# Altium PCB Custom_Keyboard.PcbDoc (part 1 of 4)
Units mil, origin at the board's own origin, x right, y up, seen from the top; angles counter-clockwise.
Board outline 4767 x 2153 mil, 2 copper layers (Top Layer, Bottom Layer), stack 57 mil thick; 298 components, 247 nets, 1117 pads, 576 vias.
Unrouted connection lines stored in the file: 2.
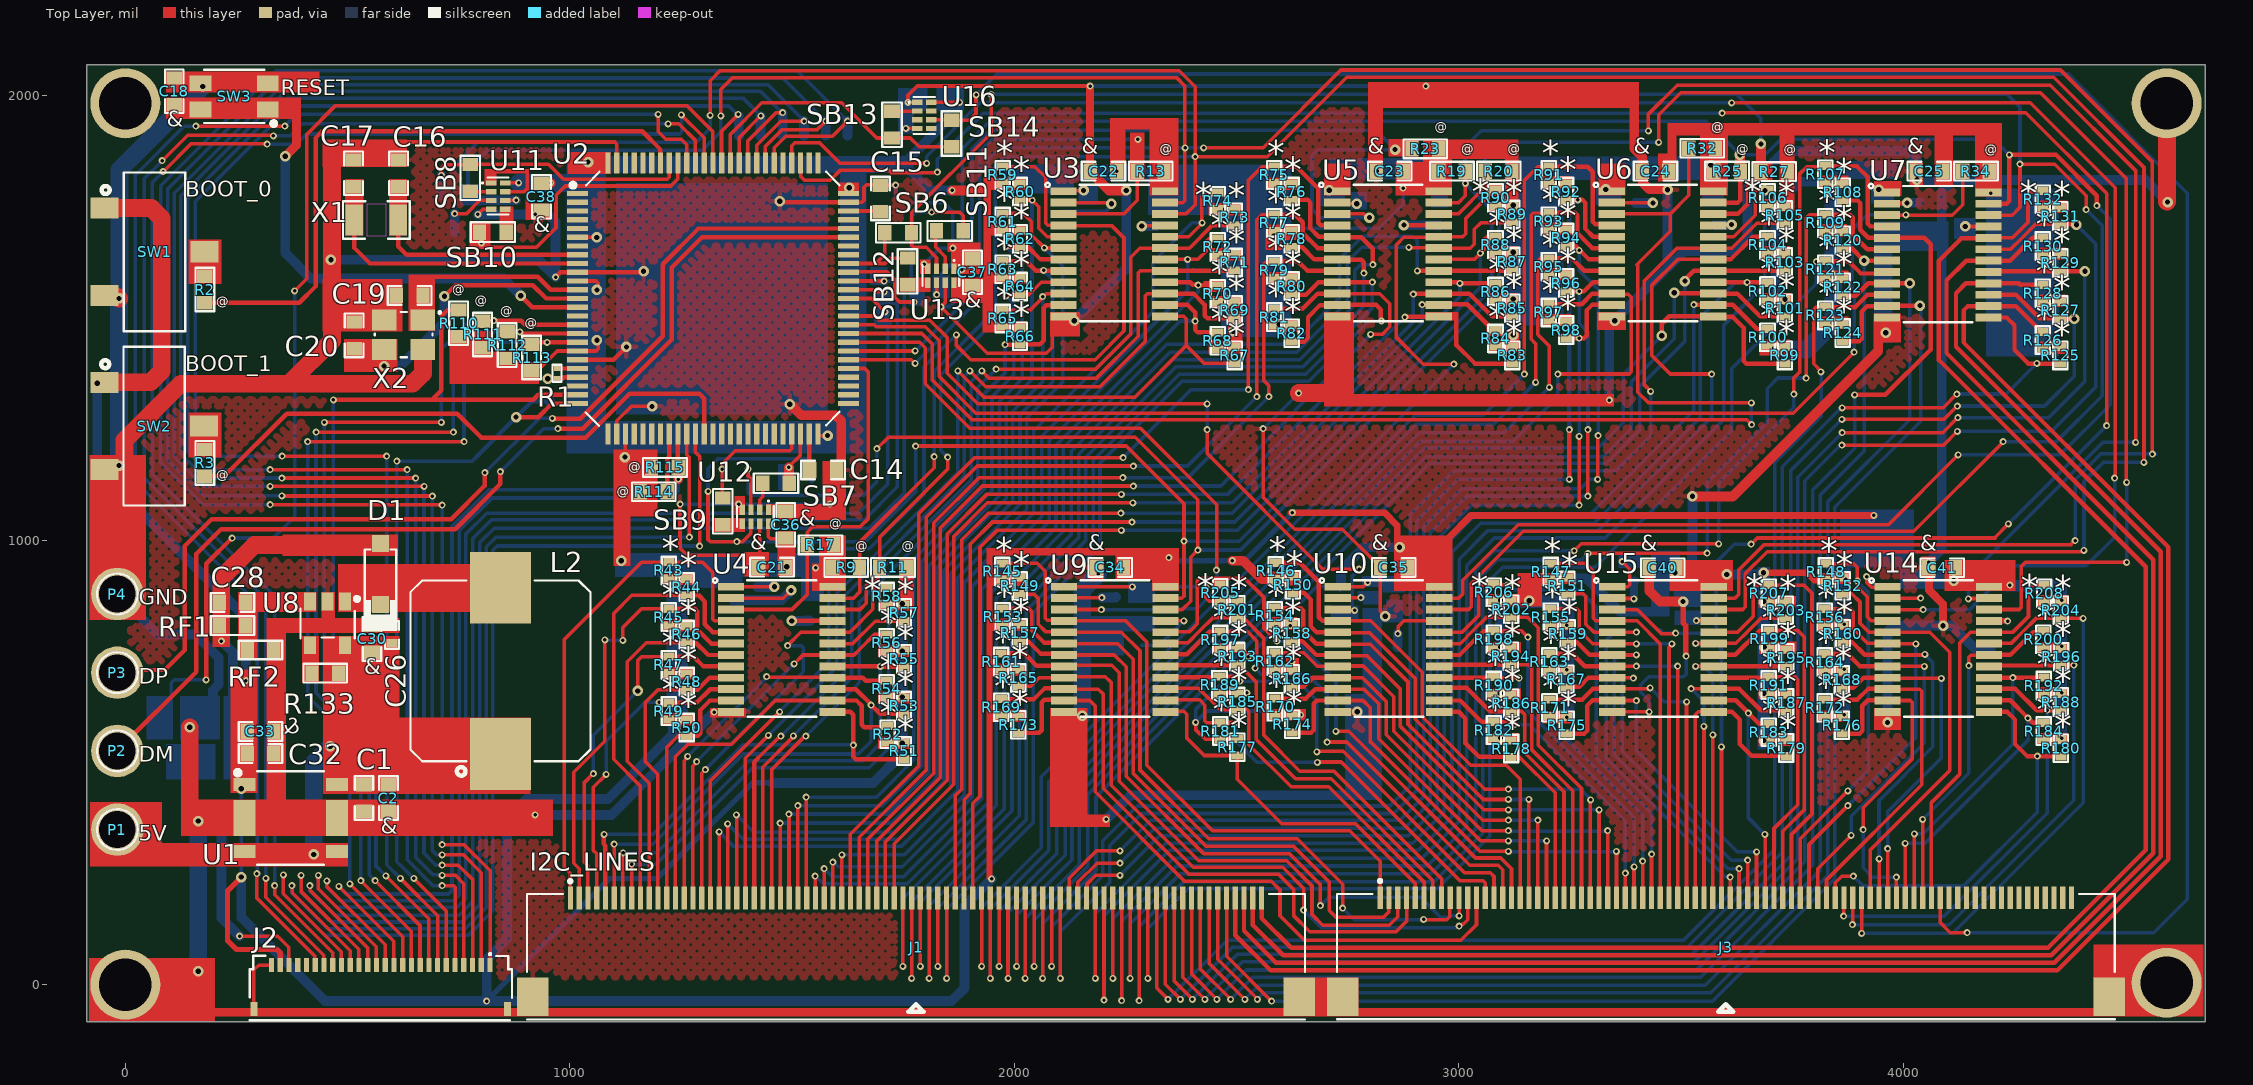
[diagram p0: Top Layer view]
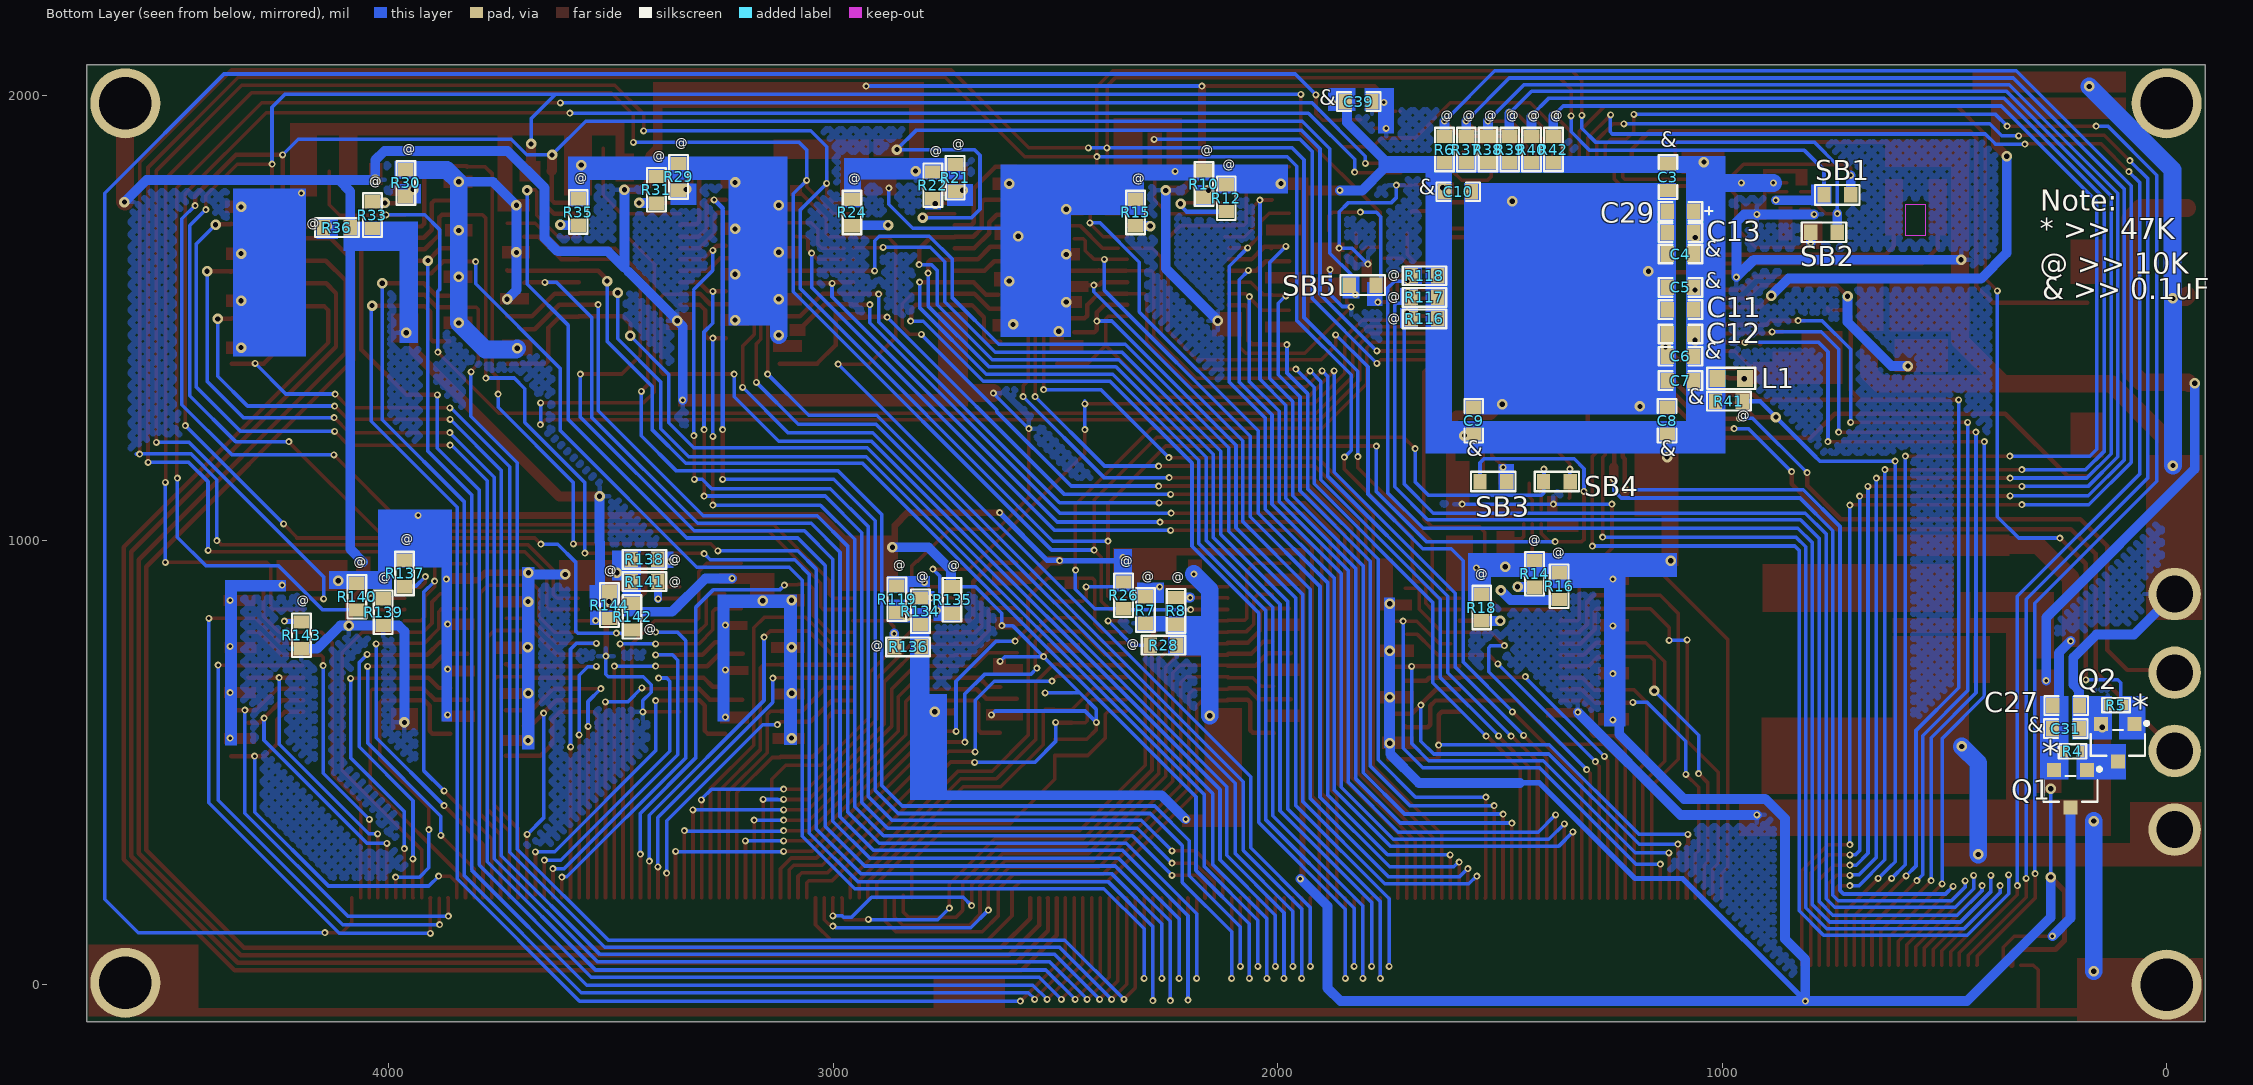
[diagram p1: Bottom Layer view, seen from below]
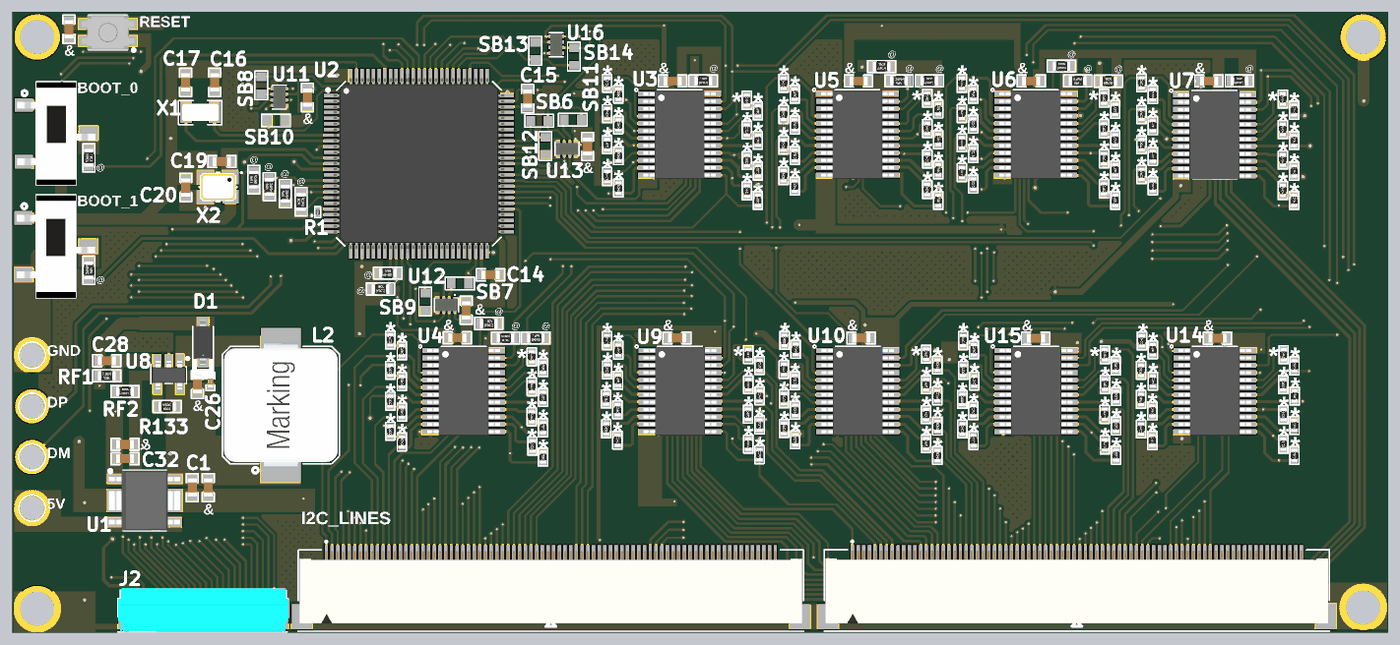
[diagram p4: 3D render of the assembled board from above, using the file's embedded part models]
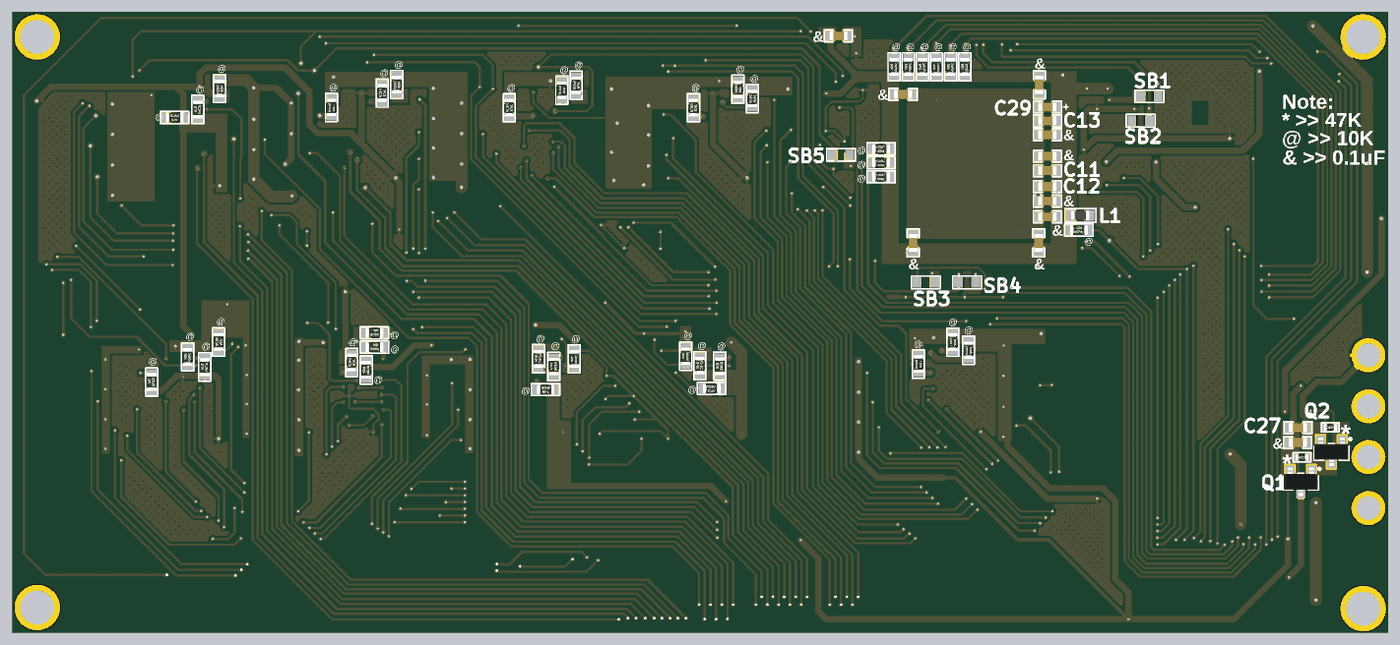
[diagram p5: 3D render of the assembled board from below, using the file's embedded part models]

## Layer stack, top to bottom
Top Solder: solder mask 3, Solder Resist, Dk 3.5
Top Layer: signal copper 10
Dielectric 1: dielectric 37, FR-4, Dk 4.8
Bottom Layer: signal copper 10
Bottom Solder: solder mask 3, Solder Resist, Dk 3.5

## Board outline
-87,-83 -87,2070 4680,2070 4680,-83

## Design rules (kind name [scope] priority, off if disabled: settings)
Clearance [All] p1: gap=7 ignorepadtopadclearanceinfootprint=FALSE except(0: Arc-Hole Track-Hole SMDPad-Hole THPad-Hole Via-Hole Fill-Hole Poly-Hole Region-Hole Text-Hole; 3: Arc-SMDPad Track-SMDPad SMDPad-SMDPad)
HoleSize [All] p1: absolutevalues=TRUE maxlimit=1000 minlimit=1 maxpercent=80.000 minpercent=20.000
HoleToHoleClearance [All] p1: gap=0 allowstackedmicrovias=TRUE
MinimumSolderMaskSliver [All] p1: minsoldermaskwidth=0
PolygonConnect [All] p1: connectstyle=Relief reliefconductorwidth=10 reliefentries=4 polygonreliefangle="90 Angle" airgapwidth=10
RoutingVias [All] p1: holewidth=11.81 width=23.62 viastyle="Through Hole" minholewidth=7.87 minwidth=15.75 maxholewidth=11.81 maxwidth=23.62
SilkToSilkClearance [All] p1: silktosilkclearance=0
SilkToSolderMaskClearance [IsPad] p1: minsilkscreentomaskgap=0 clearancetoexposedcopper=TRUE
SolderMaskExpansion [All] p1: expansion=4 istentingtop=FALSE
Width [All] p1: maxlimit=40 minlimit=8 preferedwidth=22
25 further rules are at their usual default settings.

## Classes and differential pairs
component class U_Rpull_Section2: R145 R146 R147 R148 R149 R150 R151 R152 R153 R154 R155 R156 R157 R158 R159 R160 R161 R162 R163 R164 R165 R166 R167 R168 R169 R170 R171 R172 R173 R174 R175 R176 R177 R178 R179 R180 R181 R182 R183 R184 R185 R186 R187 R188 R189 R190 R191 R192 R193 R194 R195 R196 R197 R198 R199 R200 R201 R202 R203 R204 R205 R206 R207 R208
component class "U_Mux_Sheet _3": C40 C41 R137 R138 R139 R140 R141 R142 R143 R144 U14 U15
component class U_Connector_Sheet_2: J3
component class U_BufferIC_Section: C36 C37 C38 C39 SB1 SB2 SB3 SB4 SB5 SB6 SB7 SB8 SB9 SB10 SB11 SB12 SB13 SB14 U11 U12 U13 U16
component class U_RPull_Section: R43 R44 R45 R46 R47 R48 R49 R50 R51 R52 R53 R54 R55 R56 R57 R58 R59 R60 R61 R62 R63 R64 R65 R66 R67 R68 R69 R70 R71 R72 R73 R74 R75 R76 R77 R78 R79 R80 R81 R82 R83 R84 R85 R86 R87 R88 R89 R90 R91 R92 R93 R94 R95 R96 R97 R98 R99 R100 R101 R102 R103 R104 R105 R106 R107 R108 R109 R120 R121 R122 R123 R124 R125 R126 R127 R128 R129 R130 R131 R132
component class U_Power_Section: C1 C2 C26 C27 C28 C30 C31 C32 C33 D1 L2 Q1 Q2 R4 R5 R133 RF1 RF2 U1 U8
component class U_Mux_Sheet_2: C24 C25 C35 R25 R27 R29 R30 R31 R32 R33 R34 R35 R36 R119 R134 R135 R136 U6 U7 U10
component class U_Mux_Sheet_1: C21 C22 C23 C34 R7 R8 R9 R10 R11 R12 R13 R14 R15 R16 R17 R18 R19 R20 R21 R22 R23 R24 R26 R28 U3 U4 U5 U9
component class U_Controller_Section_2: R6 R37 R38 R39 R40 R41 R42 R110 R111 R112 R113 R114 R115 R116 R117 R118
component class U_Controller_Section_1: C3 C4 C5 C6 C7 C8 C9 C10 C11 C12 C13 C14 C15 C16 C17 C18 C19 C20 C29 L1 R1 R2 R3 SW1 SW2 SW3 U2 X1 X2
component class U_Connector_Sheet: J1 J2 P1 P2 P3 P4

## Components (designator, comment, footprint, x,y, rotation, side; value= is the part's Value field where it differs from the comment)
C1 "4.7UF" Cap0603#1 537,420 r270 top locked
C2 "0.1uF" Cap0603#1 592,420 r270 top locked
C3 "0.1uF" Cap0603#1 1122,1817 r270 bottom
C4 "0.1uF" Cap0603#1 1094,1644 r0 bottom locked
C5 "0.1uF" Cap0603#1 1094,1569 r0 bottom locked
C6 "0.1uF" Cap0603#1 1094,1414 r0 bottom locked
C7 "0.1uF" Cap0603#1 1094,1359 r0 bottom locked
C8 "0.1uF" Cap0603#1 1124,1269 r90 bottom locked
C9 "0.1uF" Cap0603#1 1559,1269 r90 bottom locked
C10 "0.1uF" Cap0603#1 1594,1784 r180 bottom locked
C11 "1uF" Cap0603#1 1094,1519 r0 bottom locked
C12 "1uF" Cap0603#1 1094,1464 r0 bottom locked
C13 "4.7UF" Cap0603#1 1094,1692 r0 bottom
C14 "2.2uF" Cap0603#1 1570,1158 r0 top locked
C15 "2.2uF" Cap0603#1 1699,1769 r90 top locked
C16 "10pF" Cap0603#1 614.71,1825.5 r270 top
C17 "10pF" Cap0603#1 513.71,1825.5 r270 top
C18 "0.1uF" Cap0603#1 110,2010 r90 top locked
C19 "10pF" Cap0603#1 639.61,1550.93 r0 top
C20 "10pF" Cap0603#1 514.61,1460.93 r270 top
C21 "0.1uF" Cap0603#1 1455,939.5 r180 top locked
C22 "0.1uF" Cap0603#2 2201,1830.5 r180 top
C23 "0.1uF" Cap0603#2 2845,1830.5 r180 top locked
C24 "0.1uF" Cap0603#2 3443,1830.5 r180 top locked
C25 "0.1uF" Cap0603#1 4059,1830.5 r180 top
C26 "2.2uF" "Cap 0402" 600,787 r90 top locked
C27 "10uF" Cap0603#1 226,628 r180 bottom
C28 "220pF" Cap0603#1 241,860 r180 top locked
C29 "1uF" F981E105MMA 1094,1740 r0 bottom
C30 "0.1uF" Cap0603#1 555,778 r90 top locked
C31 "0.1uF" Cap0603#1 227,576 r180 bottom
C32 "4.7UF" Cap0603#1 304,520 r0 top locked
C33 "0.1uF" Cap0603#1 304,570 r0 top locked
C34 "0.1uF" Cap0603#1 2216,939 r180 top
C35 "0.1uF" Cap0603#1 2854,939 r180 top
C36 "0.1uF" Cap0603#1 1486,1035 r90 top
C37 "0.1uF" Cap0603#1 1906,1603 r90 top
C38 "0.1uF" Cap0603#1 936,1773 r270 top
C39 "0.1uF" Cap0603#1 1818,1987 r180 bottom
C40 "0.1uF" Cap0603#1 3459,938 r180 top
C41 "0.1uF" Cap0603#1 4088,938 r180 top
D1 "MBR0520" SOD-123 574,924 r90 top
J1 "046288080000846+" 046288080000846+ 1779,83.78 r0 top locked
J2 "FH34SRJ-26S-0.5SH(50)" FH34SRJ-26S-0.5SH(50) 574.7,-5.21 r0 top locked
J3 "046288080000846+" 046288080000846+ 3601.2,84.22 r0 top locked
L1 "FBMH1608HL121-TV" "IND 0603" 979.91,1364 r180 bottom locked
L2 "3.3UH" 74437368033 844,706 r90 top locked
P1 "" "TEST POINT" -18,349 r270 top
P2 "" "TEST POINT" -18,526 r270 top
P3 "" "TEST POINT" -18,702 r270 top
P4 "" "TEST POINT" -18,879 r270 top
Q1 "FDN338P" SOT23-3 216.41,440.68 r0 bottom
Q2 "FDN335N" SOT23-3 110,544 r0 bottom
R1 "0R" Res-0201 971.39,1375.57 r270 top locked
R2 "10K" Res0603 179,1564 r90 top locked
R3 "10K" Res0603 179,1174 r90 top locked
R4 "47K" Res0402#1 212,525 r180 bottom
R5 "47K" Res0402#1 114,629 r180 bottom
R6 "10K" Res0603 1625,1879 r270 bottom locked
R7 "10K" Res0603 2298,843 r270 bottom
R8 "10K" Res0603 2229,841 r270 bottom
R9 "10K" Res0603 1622,939 r0 top locked
R10 "10K" Res0603 2166,1801.5 r90 bottom locked
R11 "10K" Res0603 1727,939 r180 top locked
R12 "10K" Res0603 2116,1769.5 r90 bottom locked
R13 "10K" Res0603 2307,1830.5 r180 top
R14 "10K" Res0603 1422,924.5 r90 bottom locked
R15 "10K" Res0603 2320,1737.5 r90 bottom locked
R16 "10K" Res0603 1367,896.5 r90 bottom locked
R17 "10K" Res0603 1564,989.5 r180 top
R18 "10K" Res0603 1541,848.5 r90 bottom locked
R19 "10K" Res0603 2985,1830.5 r0 top locked
R20 "10K" Res0603 3090,1830.5 r180 top locked
R21 "10K" Res0603 2726,1815.5 r90 bottom locked
R22 "10K" Res0603 2776,1798.5 r90 bottom locked
R23 "10K" Res0603 2925,1880.5 r180 top locked
R24 "10K" Res0603 2958,1737.5 r90 bottom locked
R25 "10K" Res0603 3604,1830.5 r0 top locked
R26 "10K" Res0603 2347,876 r270 bottom
R27 "10K" Res0603 3710,1829.5 r180 top locked
R28 "10K" Res0603 2257,764 r180 bottom
R29 "10K" Res0603 3348,1817.5 r90 bottom locked
R30 "10K" Res0603 3961.65,1803.93 r90 bottom locked
R31 "10K" Res0603 3398,1788.5 r90 bottom locked
R32 "10K" Res0603 3548,1882 r180 top locked
R33 "10K" Res0603 4037.08,1731.5 r270 bottom
R34 "10K" Res0603 4164,1830.5 r180 top
R35 "10K" Res0603 3574,1738.5 r90 bottom locked
R36 "10K" Res0603 4117,1703.5 r180 bottom
R37 "10K" Res0603 1576,1879 r270 bottom locked
R38 "10K" Res0603 1527,1879 r270 bottom locked
R39 "10K" Res0603 1478,1879 r270 bottom locked
R40 "10K" Res0603 1429,1879 r270 bottom locked
R41 "10K" Res0603 985,1313 r0 bottom
R42 "10K" Res0603 1380,1879 r270 bottom locked
R43 "47K" Res0402#1 1223,932 r270 top locked
R44 "47K" Res0402#1 1263,894.5 r90 top locked
R45 "47K" Res0402#1 1223,827 r270 top locked
R46 "47K" Res0402#1 1263,788 r90 top locked
R47 "47K" Res0402#1 1223,719.5 r270 top locked
R48 "47K" Res0402#1 1263,682 r90 top locked
R49 "47K" Res0402#1 1223,615.5 r270 top locked
R50 "47K" Res0402#1 1263,578.5 r90 top locked
R51 "47K" Res0402#1 1752,525.93 r90 top locked
R52 "47K" Res0402#1 1715,563.5 r270 top locked
R53 "47K" Res0402#1 1752,628 r90 top locked
R54 "47K" Res0402#1 1713,665.5 r270 top locked
R55 "47K" Res0402#1 1752,733 r90 top locked
R56 "47K" Res0402#1 1713,769.5 r270 top locked
R57 "47K" Res0402#1 1752,836.5 r90 top locked
R58 "47K" Res0402#1 1713,873.5 r270 top locked
R59 "47K" Res0402#2 1974,1822 r270 top locked
R60 "47K" Res0402#2 2013,1784.5 r90 top locked
R61 "47K" Res0402#3 1974,1717 r270 top locked
R62 "47K" Res0402#1 2013,1678 r90 top locked
R63 "47K" Res0402#1 1974,1609.5 r270 top locked
R64 "47K" Res0402#2 2013,1571 r90 top locked
R65 "47K" Res0402#2 1974,1499 r270 top locked
R66 "47K" Res0402#2 2013,1459 r90 top locked
R67 "47K" Res0402#1 2496,1415.93 r90 top locked
R68 "47K" Res0402#2 2458,1449 r270 top locked
R69 "47K" Res0402#2 2496,1518 r90 top locked
R70 "47K" Res0402#2 2458,1554.5 r270 top locked
R71 "47K" Res0402#2 2496,1625 r90 top locked
R72 "47K" Res0402#2 2458,1660 r270 top locked
R73 "47K" Res0402#2 2496,1726.5 r90 top locked
R74 "47K" Res0402#2 2458,1763.5 r270 top locked
R75 "47K" Res0402#2 2585,1822 r270 top locked
R76 "47K" Res0402#2 2624,1784.5 r90 top locked
R77 "47K" Res0402#2 2585,1714 r270 top locked
R78 "47K" Res0402#2 2624,1678 r90 top locked
R79 "47K" Res0402#2 2585,1608 r270 top locked
R80 "47K" Res0402#2 2624,1572 r90 top locked
R81 "47K" Res0402#2 2585,1502 r270 top locked
R82 "47K" Res0402#1 2624,1465.5 r90 top locked
R83 "47K" Res0402#1 3121,1415.93 r90 top locked
R84 "47K" Res0402#2 3083,1454 r270 top locked
R85 "47K" Res0402#2 3121,1522 r90 top locked
R86 "47K" Res0402#2 3083,1559.5 r270 top locked
R87 "47K" Res0402#2 3121,1627 r90 top locked
R88 "47K" Res0402#2 3083,1665 r270 top locked
R89 "47K" Res0402#2 3121,1733 r90 top locked
R90 "47K" Res0402#2 3083,1770.5 r270 top locked
R91 "47K" Res0402#2 3203,1822 r270 top locked
R92 "47K" Res0402#2 3242,1784.5 r90 top locked
R93 "47K" Res0402#2 3203,1717.5 r270 top locked
R94 "47K" Res0402#2 3242,1681 r90 top locked
R95 "47K" Res0402#2 3203,1615.5 r270 top locked
R96 "47K" Res0402#2 3242,1578.5 r90 top locked
R97 "47K" Res0402#2 3203,1512.5 r270 top locked
R98 "47K" Res0402#2 3242,1473 r90 top locked
R99 "47K" Res0402#2 3734,1415.93 r90 top locked
R100 "47K" Res0402#2 3695,1456.5 r270 top locked
R101 "47K" Res0402#2 3734,1522 r90 top locked
R102 "47K" Res0402#2 3695,1560.5 r270 top locked
R103 "47K" Res0402#2 3734,1626 r90 top locked
R104 "47K" Res0402#2 3695,1664.5 r270 top locked
R105 "47K" Res0402#2 3734,1731.5 r90 top locked
R106 "47K" Res0402#2 3695,1770.5 r270 top locked
R107 "47K" Res0402#1 3825,1823.43 r270 top locked
R108 "47K" Res0402#1 3864,1782.93 r90 top locked
R109 "47K" Res0402#1 3825,1714 r270 top locked
R110 "10K" Res0603 750,1488 r270 top locked
R111 "10K" Res0603 804,1463 r270 top locked
R112 "10K" Res0603 859,1439 r270 top locked
R113 "10K" Res0603 914,1411 r270 top locked
R114 "10K" Res0603 1189,1109 r180 top locked
R115 "10K" Res0603 1214,1164 r180 top locked
R116 "10K" Res0603 1670,1498 r180 bottom
R117 "10K" Res0603 1670,1546.5 r180 bottom
R118 "10K" Res0603 1670,1595 r180 bottom
R119 "10K" Res0603 2857,867 r270 bottom
R120 "47K" Res0402#1 3864,1675 r90 top locked
R121 "47K" Res0402#1 3825,1609.5 r270 top locked
R122 "47K" Res0402#1 3864,1569 r90 top locked
R123 "47K" Res0402#1 3825,1505.93 r270 top locked
R124 "47K" Res0402#1 3864,1466.43 r90 top locked
R125 "47K" Res0402#1 4353.65,1415.93 r90 top locked
R126 "47K" Res0402#1 4314.65,1450.43 r270 top locked
R127 "47K" Res0402#1 4353.65,1517.93 r90 top locked
R128 "47K" Res0402#1 4314.65,1555.93 r270 top locked
R129 "47K" Res0402#1 4353.65,1623.93 r90 top locked
R130 "47K" Res0402#1 4314.65,1661.93 r270 top locked
R131 "47K" Res0402#1 4353.65,1729.43 r90 top locked
R132 "47K" Res0402#1 4314.65,1767.43 r270 top locked
R133 "51K" Res0603 450,701 r0 top locked
R134 "10K" Res0603 2804,840 r270 bottom
R135 "10K" Res0603 2733,866 r270 bottom
R136 "10K" Res0603 2832,760 r180 bottom
R137 "10K" Res0603 3964.83,925.25 r90 bottom
R138 "10K" Res0603 3425,957 r0 bottom
R139 "10K" Res0603 4013,838 r270 bottom
R140 "10K" Res0603 4072,873 r270 bottom
R141 "10K" Res0603 3425,907 r0 bottom
R142 "10K" Res0603 3453,828 r270 bottom
R143 "10K" Res0603 4197,786 r270 bottom
R144 "10K" Res0603 3504,854 r90 bottom
R145 "47K" Res0402#1 1973.59,929.63 r270 top
R146 "47K" Res0402#1 2588.41,930.77 r270 top
R147 "47K" Res0402#1 3207.07,929.59 r270 top
R148 "47K" Res0402#1 3826.42,928.57 r270 top
R149 "47K" Res0402#1 2012.52,897.07 r90 top
R150 "47K" Res0402#1 2627,900 r90 top
R151 "47K" Res0402#1 3244.65,897.82 r90 top
R152 "47K" Res0402#1 3863.83,897.8 r90 top
R153 "47K" Res0402#1 1974,828 r270 top
R154 "47K" Res0402#1 2586,830 r270 top
R155 "47K" Res0402#1 3207.25,826.84 r270 top
R156 "47K" Res0402#1 3823.42,826.82 r270 top
R157 "47K" Res0402#1 2012,792 r90 top
R158 "47K" Res0402#1 2624,791 r90 top
R159 "47K" Res0402#1 3245.31,789.39 r90 top
R160 "47K" Res0402#1 3864.48,789.37 r90 top
R161 "47K" Res0402#1 1970.52,727.07 r270 top
R162 "47K" Res0402#1 2586.35,728.2 r270 top
R163 "47K" Res0402#1 3204,726.02 r270 top
R164 "47K" Res0402#1 3823.42,726 r270 top
R165 "47K" Res0402#1 2009.52,690.07 r90 top
R166 "47K" Res0402#1 2624.59,688.2 r90 top
R167 "47K" Res0402#1 3242.25,687.02 r90 top
R168 "47K" Res0402#1 3862.42,686 r90 top
R169 "47K" Res0402#1 1971,624 r270 top
R170 "47K" Res0402#1 2586.83,625.2 r270 top
R171 "47K" Res0402#1 3204.48,623.02 r270 top
R172 "47K" Res0402#1 3823.42,623 r270 top
R173 "47K" Res0402#1 2009.52,584.57 r90 top
R174 "47K" Res0402#1 2625.35,585.7 r90 top
R175 "47K" Res0402#1 3243,583.52 r90 top
R176 "47K" Res0402#1 3862.17,583.5 r90 top
R177 "47K" Res0402#1 2502.17,534.07 r90 top
R178 "47K" Res0402#1 3118,531.2 r90 top
R179 "47K" Res0402#1 3737,532.5 r90 top
R180 "47K" Res0402#1 4354.83,532 r90 top
R181 "47K" Res0402#1 2463.17,570.57 r270 top
R182 "47K" Res0402#1 3079,572.7 r270 top
R183 "47K" Res0402#1 3698,568 r270 top
R184 "47K" Res0402#1 4316.33,570.5 r270 top
R185 "47K" Res0402#1 2502.17,637.07 r90 top
R186 "47K" Res0402#1 3118,633.2 r90 top
R187 "47K" Res0402#1 3736.65,634.02 r90 top
R188 "47K" Res0402#1 4354.83,636 r90 top
R189 "47K" Res0402#1 2462,675 r270 top
R190 "47K" Res0402#1 3078.83,673.2 r270 top
R191 "47K" Res0402#1 3697.48,674.02 r270 top
R192 "47K" Res0402#1 4316.65,673 r270 top
R193 "47K" Res0402#1 2502,738.5 r90 top
R194 "47K" Res0402#1 3117.57,738.77 r90 top
R195 "47K" Res0402#1 3737.22,735.59 r90 top
R196 "47K" Res0402#1 4355.39,737.57 r90 top
R197 "47K" Res0402#1 2463.17,776.5 r270 top
R198 "47K" Res0402#1 3079,777.2 r270 top
R199 "47K" Res0402#1 3698.65,778.02 r270 top
R200 "47K" Res0402#1 4315.83,777 r270 top
R201 "47K" Res0402#1 2502.17,843.57 r90 top
R202 "47K" Res0402#1 3118,844.7 r90 top
R203 "47K" Res0402#1 3735.65,842.52 r90 top
R204 "47K" Res0402#1 4354.83,842.5 r90 top
R205 "47K" Res0402#1 2463.17,881.57 r270 top
R206 "47K" Res0402#1 3079,882.7 r270 top
R207 "47K" Res0402#1 3698,880.52 r270 top
R208 "47K" Res0402#1 4317.17,880.5 r270 top
RF1 "68K" Res0603 241,808 r0 top locked
RF2 "13.3K" Res0603 304,753 r180 top locked
SB1 "Solder Bridge" "Solder Bridge" 741,1777 r0 bottom
SB2 "Solder Bridge" "Solder Bridge" 771,1693 r180 bottom
SB3 "Solder Bridge" "Solder Bridge" 1515,1132 r0 bottom
SB4 "Solder Bridge" "Solder Bridge" 1372,1132 r0 bottom
SB5 "Solder Bridge" "Solder Bridge" 1809,1574 r0 bottom
SB6 "Solder Bridge" "Solder Bridge" 1739,1692 r0 top
SB7 "Solder Bridge" "Solder Bridge" 1464,1128 r180 top
SB8 "Solder Bridge" "Solder Bridge" 776,1815.32 r270 top
SB9 "Solder Bridge" "Solder Bridge" 1344,1065 r270 top
SB10 "Solder Bridge" "Solder Bridge" 827,1693.32 r0 top
SB11 "Solder Bridge" "Solder Bridge" 1855,1696 r180 top
SB12 "Solder Bridge" "Solder Bridge" 1759.99,1604.89 r270 top
SB13 "Solder Bridge" "Solder Bridge" 1725,1935 r90 top
SB14 "Solder Bridge" "Solder Bridge" 1859,1915 r90 top
SW1 "SS-3235D-03-L2" SS-3235D-03-L2 65.8,1649 r270 top locked
SW2 "SS-3235D-03-L2" SS-3235D-03-L2 64.8,1257 r270 top locked
SW3 "TS-1185EC-C-D-B" TS-1185EC-C-D-B 244.79,1998.47 r180 top locked
U1 "S-1172B33-E6T1U" HSOP-6 372,375 r0 top locked
U2 "STM32F407VGT7TR" LQFP-100 1322.11,1543.88 r0 top locked
U3 "TCA9548APWR" 24-TSSOP 2225,1644.5 r0 top
U4 "TCA9548APWR" 24-TSSOP 1477,754.5 r0 top
U5 "TCA9548APWR" 24-TSSOP 2841,1644.5 r0 top locked
U6 "TCA9548APWR" 24-TSSOP 3458.83,1644.5 r0 top locked
U7 "TCA9548APWR" 24-TSSOP 4077.83,1641.93 r0 top locked
U8 "LM27313XMF/NOPB" SOT23-5 455,813 r270 top locked
U9 "TCA9548APWR" 24-TSSOP 2226.35,754.5 r0 top locked
U10 "TCA9548APWR" 24-TSSOP 2842.17,754.5 r0 top
U11 "74LVC2G125HD4-7" 74LVC2G125HD4-7 838.75,1774.47 r0 top
U12 "74LVC2G125HD4-7" 74LVC2G125HD4-7 1417.47,1053.25 r270 top
U13 "74LVC2G125HD4-7" 74LVC2G125HD4-7 1835,1595 r270 top
U14 "TCA9548APWR" 24-TSSOP 4079,754.5 r0 top
U15 "TCA9548APWR" 24-TSSOP 3459.83,754.5 r0 top
U16 "74LVC2G125HD4-7" 74LVC2G125HD4-7 1797.75,1955.84 r0 top
X1 "32.768KHz" Q13FC1350000200 564.71,1720.5 r180 top
X2 "25MHz" S3225000101040 626.31,1462.46 r180 top

## Footprints (in the part's own frame and the unit in brackets; to place one, negate y for a bottom-side part, rotate by r counter-clockwise, add the part's x,y. Pads: shape width x height; smd on the part's side, far side on the other; paste and mask are expansions set on the pad)
24-TSSOP [mm] "IC BUS SWITCH 1 X 8:1 24TSSOP"
  rect 1.5x0.45 smd: 1(-2.9,3.575) 2(-2.9,2.925) 3(-2.9,2.275) 4(-2.9,1.625) 5(-2.9,0.975) 6(-2.9,0.325) 7(-2.9,-0.325) 8(-2.9,-0.975) 9(-2.9,-1.625) 10(-2.9,-2.275) 11(-2.9,-2.925) 12(-2.9,-3.575) 13(2.9,-3.575) 14(2.9,-2.925) 15(2.9,-2.275) 16(2.9,-1.625) 17(2.9,-0.975) 18(2.9,-0.325) 19(2.9,0.325) 20(2.9,0.975) 21(2.9,1.625) 22(2.9,2.275) 23(2.9,2.925) 24(2.9,3.575)
  silkscreen extent -3.94,-3.85 1.99,4.06, body extent -3.2,-3.9 3.2,3.9, height 1.2
74LVC2G125HD4-7 [mm]
  rect 0.6x0.3 smd: 1(-0.4,0.75) 2(-0.4,0.25) 3(-0.4,-0.25) 4(-0.4,-0.75) 5(0.4,-0.75) 6(0.4,-0.25) 7(0.4,0.25) 8(0.4,0.75)
  silkscreen extent -0.91,-1.05 0.59,1.05, body extent -0.52,-1 0.53,1, height 0.6
74437368033 [mm]
  rect 4.1x3.5 smd: 1(-4.75,0) 2(4.75,0)
  silkscreen extent -5.99,-5.15 5.17,5.15, body extent -5.5,-5 5.5,5, height 3.7
046288080000846+ [mm]
  rect 0.3x1.3 smd: 1(-19.75,2.825) 2(-19.25,2.825) 3(-18.75,2.825) 4(-18.25,2.825) 5(-17.75,2.825) 6(-17.25,2.825) 7(-16.75,2.825) 8(-16.25,2.825) 9(-15.75,2.825) 10(-15.25,2.825) 11(-14.75,2.825) 12(-14.25,2.825) 13(-13.75,2.825) 14(-13.25,2.825) 15(-12.75,2.825) 16(-12.25,2.825) 17(-11.75,2.825) 18(-11.25,2.825) 19(-10.75,2.825) 20(-10.25,2.825) 21(-9.75,2.825) 22(-9.25,2.825) 23(-8.75,2.825) 24(-8.25,2.825) 25(-7.75,2.825) 26(-7.25,2.825) 27(-6.75,2.825) 28(-6.25,2.825) 29(-5.75,2.825) 30(-5.25,2.825) 31(-4.75,2.825) 32(-4.25,2.825) 33(-3.75,2.825) 34(-3.25,2.825) 35(-2.75,2.825) 36(-2.25,2.825) 37(-1.75,2.825) 38(-1.25,2.825) 39(-0.75,2.825) 40(-0.25,2.825) 41(0.25,2.825) 42(0.75,2.825) 43(1.25,2.825) 44(1.75,2.825) 45(2.25,2.825) 46(2.75,2.825) 47(3.25,2.825) 48(3.75,2.825) 49(4.25,2.825) 50(4.75,2.825) 51(5.25,2.825) 52(5.75,2.825) 53(6.25,2.825) 54(6.75,2.825) 55(7.25,2.825) 56(7.75,2.825) 57(8.25,2.825) 58(8.75,2.825) 59(9.25,2.825) 60(9.75,2.825) 61(10.25,2.825) 62(10.75,2.825) 63(11.25,2.825) 64(11.75,2.825) 65(12.25,2.825) 66(12.75,2.825) 67(13.25,2.825) 68(13.75,2.825) 69(14.25,2.825) 70(14.75,2.825) 71(15.25,2.825) 72(15.75,2.825) 73(16.25,2.825) 74(16.75,2.825) 75(17.25,2.825) 76(17.75,2.825) 77(18.25,2.825) 78(18.75,2.825) 79(19.25,2.825) 80(19.75,2.825)
  rect 1.8x2.2 smd: MP1(-21.9,-2.825) MP2(21.9,-2.825)
  silkscreen extent -22.22,-4.11 22.23,3.84, body extent -22.1,-3.43 22.1,2.97, height 2.1
Cap0603#1 [mil]
  rect 30x35 smd mask+2.36: 1(-30,0) 2(30,0)
  silkscreen extent -49,-21 49,21, body extent -32,-16 31,16, height 34
Cap0603#2 [mil]
  rect 30x35 smd: 1(-30,0) 2(30,0)
  silkscreen extent -49,-21 49,21, body extent -32,-16 31,16, height 34
"Cap 0402" [mil]
  rect 18x25 smd mask+2.36: 1(-18.5,0) 2(18.5,0)
  silkscreen extent -31,-16 31,16, body extent -20,-10 20,10, height 19
F981E105MMA [mil]
  rect 30x35 smd mask+2.36: 1(-30,0) 2(30,0)
  silkscreen extent -72,-21 49,21, body extent -32,-16 31,16, height 34
FH34SRJ-26S-0.5SH(50) [mm] "CONN FFC FPC 26POS 0.50MM R/A"
  rect 0.3x0.8 smd: 1(6.25,1.25) 2(5.75,1.25) 3(5.25,1.25) 4(4.75,1.25) 5(4.25,1.25) 6(3.75,1.25) 7(3.25,1.25) 8(2.75,1.25) 9(2.25,1.25) 10(1.75,1.25) 11(1.25,1.25) 12(0.75,1.25) 13(0.25,1.25) 14(-0.25,1.25) 15(-0.75,1.25) 16(-1.25,1.25) 17(-1.75,1.25) 18(-2.25,1.25) 19(-2.75,1.25) 20(-3.25,1.25) 21(-3.75,1.25) 22(-4.25,1.25) 23(-4.75,1.25) 24(-5.25,1.25) 25(-5.75,1.25) 26(-6.25,1.25)
  rect 0.4x0.8 smd: MP1(-7.25,-1.25) MP2(7.25,-1.25)
  silkscreen extent -7.49,-1.91 7.49,1.94, body extent -7.5,-1.9 7.5,1.9, height 1
HSOP-6 [mm] "1A 60dB@(1kHz) 100mV@(300mA) Fixed 3.3V~3.3V Positive 1 5.5V HSOP-6"
  rect 1.27x0.76 smd: 1(-2.64,1.91) 3(-2.64,-1.91) 4(2.64,-1.91) 6(2.64,1.91)
  rect 1.27x2.03 smd: 2(-2.64,0) 5(2.64,0)
  silkscreen extent -3.15,-2.67 1.91,2.72, body extent -3.14,-2.65 3.14,2.65, height 1.6
"IND 0603" [mm]
  rect 0.9x0.97 smd: 1(-0.785,0) 2(0.785,0)
  silkscreen extent -1.37,-0.61 1.37,0.61, body extent -0.8,-0.4 0.8,0.4, height 0.76
LQFP-100 [mm]
  rect 1.2x0.3 smd: 1(-7.75,6) 2(-7.75,5.5) 3(-7.75,5) 4(-7.75,4.5) 5(-7.75,4) 6(-7.75,3.5) 7(-7.75,3) 8(-7.75,2.5) 9(-7.75,2) 10(-7.75,1.5) 11(-7.75,1) 12(-7.75,0.5) 13(-7.75,0) 14(-7.75,-0.5) 15(-7.75,-1) 16(-7.75,-1.5) 17(-7.75,-2) 18(-7.75,-2.5) 19(-7.75,-3) 20(-7.75,-3.5) 21(-7.75,-4) 22(-7.75,-4.5) 23(-7.75,-5) 24(-7.75,-5.5) 25(-7.75,-6) 51(7.75,-6) 52(7.75,-5.5) 53(7.75,-5) 54(7.75,-4.5) 55(7.75,-4) 56(7.75,-3.5) 57(7.75,-3) 58(7.75,-2.5) 59(7.75,-2) 60(7.75,-1.5) 61(7.75,-1) 62(7.75,-0.5) 63(7.75,0) 64(7.75,0.5) 65(7.75,1) 66(7.75,1.5) 67(7.75,2) 68(7.75,2.5) 69(7.75,3) 70(7.75,3.5) 71(7.75,4) 72(7.75,4.5) 73(7.75,5) 74(7.75,5.5) 75(7.75,6)
  rect 0.3x1.2 smd: 26(-6,-7.75) 27(-5.5,-7.75) 28(-5,-7.75) 29(-4.5,-7.75) 30(-4,-7.75) 31(-3.5,-7.75) 32(-3,-7.75) 33(-2.5,-7.75) 34(-2,-7.75) 35(-1.5,-7.75) 36(-1,-7.75) 37(-0.5,-7.75) 38(0,-7.75) 39(0.5,-7.75) 40(1,-7.75) 41(1.5,-7.75) 42(2,-7.75) 43(2.5,-7.75) 44(3,-7.75) 45(3.5,-7.75) 46(4,-7.75) 47(4.5,-7.75) 48(5,-7.75) 49(5.5,-7.75) 50(6,-7.75) 76(6,7.75) 77(5.5,7.75) 78(5,7.75) 79(4.5,7.75) 80(4,7.75) 81(3.5,7.75) 82(3,7.75) 83(2.5,7.75) 84(2,7.75) 85(1.5,7.75) 86(1,7.75) 87(0.5,7.75) 88(0,7.75) 89(-0.5,7.75) 90(-1,7.75) 91(-1.5,7.75) 92(-2,7.75) 93(-2.5,7.75) 94(-3,7.75) 95(-3.5,7.75) 96(-4,7.75) 97(-4.5,7.75) 98(-5,7.75) 99(-5.5,7.75) 100(-6,7.75)
  silkscreen extent -8.13,-7.27 7.24,7.24, body extent -8,-8 8,8, height 1.6
Q13FC1350000200 [mm] "CRYSTAL 32.7680KHZ 7PF SMD"
  rect 1x1.8 smd: 1(-1.25,0) 2(1.25,0)
  Keep-Out Layer region: -0.559,-0.889 0.559,-0.889 0.559,0.889 -0.559,0.889
  silkscreen extent -1.91,-1.07 1.91,1.07, body extent -1.6,-0.78 1.6,0.72, height 0.87
Res0402#1 [mil]
  rect 18x25 smd mask+4: 1(-18.5,0) 2(18.5,0)
  silkscreen extent -32,-17 32,16, body extent -23,-11 23,11, height 16
Res0402#2 [mil]
  rect 18x25 smd: 1(-18.5,0) 2(18.5,0)
  silkscreen extent -32,-17 32,16, body extent -23,-11 23,11, height 16
Res0402#3 [mil]
  rect 18x25 smd mask+4: 1(-18.5,0)
  rect 18x25 smd: 2(18.5,0)
  silkscreen extent -32,-17 32,16, body extent -23,-11 23,11, height 16
Res0603 [mil]
  rect 30x35 smd: 1(-30,0) 2(30,0)
  silkscreen extent -49,-21 49,21, body extent -31,-17 31,17, height 18
Res-0201 [mm]
  rect 0.27x0.37 smd: 1(-0.275,0) 2(0.275,0)
  silkscreen extent -0.48,-0.25 0.48,0.25, body extent -0.3,-0.15 0.3,0.15, height 0.29
S3225000101040 [mm] "25MHz SMD Crystal Resonator 10pF 40O ±10ppm"
  rect 1.4x1.2 smd: 1(-1.1,-0.85) 2(1.1,-0.85) 3(1.1,0.85) 4(-1.1,0.85)
  silkscreen extent -2.13,-1.34 1.65,1.3, body extent -1.6,-1.25 1.6,1.25, height 0.82
SOD-123 [mm] "DIODE SCHOTTKY 100V 150MA SOD123"
  rect 0.97x0.95 smd: 1(-1.74,0) 2(1.74,0)
  silkscreen extent -3.25,-0.92 1.4,0.92, body extent -1.98,-0.85 1.98,0.85, height 1.44
"Solder Bridge" [mil] "Solder Bridge ON"
  rect 30x35 smd: 1(-30,0) 2(30,0)
  silkscreen extent -50,-22 50,22
SOT23-3 [mm] "SOT23, 3-Leads, Body 2.9x1.3mm, Pitch 0.95mm, Lead Span 2.3mm - Reverse Pinning, IPC High Density"
  rect 0.8x0.8 smd: 1(-0.95,-1.075) 2(0.95,-1.075) 3(0,1.075)
  silkscreen extent -1.73,-1.19 1.55,0.74, body extent -1.5,-1.25 1.5,1.25, height 1.05
SOT23-5 [mil] "SOT23-5 Package"
  rect 40x27 smd: 1(-49.21,39.37) 2(-49.21,0) 3(-49.21,-39.37) 4(49.21,-39.37) 5(49.21,39.37)
  silkscreen extent -59,-61 33,70, body extent -46,-58 53,60, height 43
SS-3235D-03-L2 [mm] "SPDT 50mA @ 12VDC 12V On-On SMD Toggle Switches RoHS"
  rect 1.2x1.6 smd: 1(-2.5,-2.85) 3(2.5,-2.85)
  rect 1.21x1.6 smd: 2(0,2.85)
  silkscreen extent -4.53,-3.02 4.54,1.75, body extent -4.5,-3.45 4.55,3.45, height 6.4
"TEST POINT" [mm]
  round 3 hole 2.1: 1(0,0)
  silkscreen extent -1.17,-1.16 1.17,1.17
TS-1185EC-C-D-B [mm]
  rect 1.25x0.9 smd: 1(-1.925,0.75) 1(1.925,0.75) 2(-1.925,-0.75) 2(1.925,-0.75)
  silkscreen extent -2.39,-1.52 1.73,1.68, body extent -2.33,-1.5 2.32,1.5, height 2

## Part data
C1 C13 C32: library part CL10A475KA8NQNC, "CAP CER 4.7UF 25V X5R 0603", Capacitance=4.7uF, Case Code (Imperial)=0603, Case Code (Metric)=1608, Dielectric=X5R, Manufacturer=Samsung, Max Operating Temperature=85°C, Min Operating Temperature=-55°C, Package Quantity=1, Supplier Part Number 1=1276-1900-1-ND, Tolerance=10%, Voltage Rating=25V, Case/Package=0603, ComponentLink1Description=http://www.samsungsem.com/kr/support/product-search/mlcc/CL10A475KA8NQNC.jsp?src-supplier=Digi-Key, ComponentLink1URL=http://www.samsungsem.com/kr/support/product-search/mlcc/CL10A475KA8NQNC.jsp?src-supplier=Digi-Key, Contact Plating=Tin, Depth=0.8mm, Lead Free="Lead Free", Length=1.6mm, Manufacturer Part Number=CL10A475KA8NQNC, Mount="Surface Mount", Packaging="Tape and Reel", Pricing 1="1=0.37, 10=0.255, 100=0.1528, 500=0.11456, 1000=0.09675 (USD)", Stock 1=2252340, Supplier 1=Digi-Key, Termination=Wraparound, Thickness=0.035inch, Width=0.031inch
C2 C3 C4 C5 C6 C7 C8 C9 C10 C18 C21 C22 C23 C24 C25 C30 C31 C33 C34 C35 C36 C37 C38 C39 C40 C41: library part CC0603ZRY5V9BB104, "CAP CER 0.1UF 50V Y5V 0603", Capacitance=100nF, Case Code (Imperial)=0603, Case Code (Metric)=1608, Dielectric=Y5V, Manufacturer=Yageo, Max Operating Temperature=85°C, Min Operating Temperature=-30°C, Package Quantity=1, Supplier Part Number 1=311-1343-1-ND, Tolerance=80%, Voltage=50V, Case/Package=0603, ComponentLink1Description=http://www.yageo.com/documents/recent/UPY-GPHC_Y5V_6.3V-to-50V_8.pdf?src-supplier=Digi-Key, ComponentLink1URL=http://www.yageo.com/documents/recent/UPY-GPHC_Y5V_6.3V-to-50V_8.pdf?src-supplier=Digi-Key, ComponentLink2Description=http://www.yageo.com/documents/recent/UPY-GPHC_Y5V_6.3V-to-50V_5.pdf?src-supplier=Avnet+Europe, ComponentLink2URL=http://www.yageo.com/documents/recent/UPY-GPHC_Y5V_6.3V-to-50V_5.pdf?src-supplier=Avnet+Europe, ComponentLink3Description=https://www.verical.com/server-webapp/html/getDatasheet?partID=403611&src-supplier=Verical, ComponentLink3URL=https://www.verical.com/server-webapp/html/getDatasheet?partID=403611&src-supplier=Verical, ComponentLink4Description=http://www.mouser.com/ds/2/447/Yageo_UPY-GP_NP0_16V-to-50V_9-358835.pdf?src-supplier=Mouser, ComponentLink4URL=http://www.mouser.com/ds/2/447/Yageo_UPY-GP_NP0_16V-to-50V_9-358835.pdf?src-supplier=Mouser, ComponentLink5Description=http://www.farnell.com/datasheets/1132289.pdf?src-supplier=Element14, ComponentLink5URL=http://www.farnell.com/datasheets/1132289.pdf?src-supplier=Element14, Composition=Ceramic, Depth=0.8mm, Halogen Free="Halogen Free", Height=0.8mm, Lead Free="Lead Free", Length=1.6mm, Manufacturer Part Number=CC0603ZRY5V9BB104, Mount="Surface Mount", Number of Pins=2, Packaging="Tape and Reel", Pricing 1="1=0.1, 10=0.075, 100=0.0334, 500=0.02386, 1000=0.01874 (USD)", Radiation Hardening=No, REACH SVHC="No SVHC", Stock 1=15000880, Supplier 1=Digi-Key, Termination=SMD/SMT, Thickness=0.035inch, Voltage Rating=50V, Voltage Rating (DC)=50V, Width=0.031inch
C11 C12: library part CC0603KRX5R8BB105, "CAP CER 1UF 25V X5R 0603", Case Code (Imperial)=0603, Case Code (Metric)=1608, Dielectric=X5R, Manufacturer=Yageo, Max Operating Temperature=85°C, Min Operating Temperature=-55°C, Package Quantity=1, Supplier Part Number 1=311-1445-1-ND, Tolerance=10%, Voltage Rating=25V, Capacitance=1uF, Case/Package=0603, Category="Ceramic Capacitors", ComponentLink1Description=https://datasheet.ciiva.com/176/mlccorderingcode-176785.pdf?src-supplier=Digi-Key, ComponentLink1URL=https://datasheet.ciiva.com/176/mlccorderingcode-176785.pdf?src-supplier=Digi-Key, ComponentLink2Description=https://datasheet.ciiva.com/176/mlccorderingcode-176786.pdf?src-supplier=Digi-Key, ComponentLink2URL=https://datasheet.ciiva.com/176/mlccorderingcode-176786.pdf?src-supplier=Digi-Key, ComponentLink3Description=https://datasheet.ciiva.com/176/mlccorderingcode-176787.pdf?src-supplier=Digi-Key, ComponentLink3URL=https://datasheet.ciiva.com/176/mlccorderingcode-176787.pdf?src-supplier=Digi-Key, ComponentLink4Description=https://datasheet.ciiva.com/17436/upy-gphc-x5r-4v-to-50v-12-17436952.pdf?src-supplier=Avnet+Europe, ComponentLink4URL=https://datasheet.ciiva.com/17436/upy-gphc-x5r-4v-to-50v-12-17436952.pdf?src-supplier=Avnet+Europe, ComponentLink5Description=https://datasheet.ciiva.com/7978/1525783-7978171.pdf?src-supplier=Element14, ComponentLink5URL=https://datasheet.ciiva.com/7978/1525783-7978171.pdf?src-supplier=Element14, ComponentLink6Description=https://datasheet.ciiva.com/11586/upy-gphc-x5r-4v-to-50v-12-11586318.pdf?src-supplier=Avnet, ComponentLink6URL=https://datasheet.ciiva.com/11586/upy-gphc-x5r-4v-to-50v-12-11586318.pdf?src-supplier=Avnet, Construction=Flat, Depth=0.8mm, Halogen Free="Halogen Free", Height=0.8mm, Lead Free="Lead Free", Length=1.6mm, Manufacturer Part Number=CC0603KRX5R8BB105, Mount="Surface Mount", Number of Pins=2, Packaging="Tape and Reel", Pricing 1="1=0.12000, 10=0.08400, 50=0.04760, 100=0.03940, 500=0.02764, 1000=0.02288 (USD)", Radiation Hardening=No, REACH SVHC="No SVHC", RoHS=Yes, RoHS Compliant=Yes, Series=CC, Stock 1=919939, Supplier 1=Digi-Key, Termination=SMD/SMT, Thickness=0.035inch, Voltage Rating (DC)=25V, Width=0.031inch
C14 C15: library part GRM188R6YA225KA12D, "CAP, 2.2µF, 35V, 10%, X5R, 0603", Case Code (Imperial)=0603, Case Code (Metric)=1608, Dielectric=X5R, Manufacturer=Murata, Max Operating Temperature=85°C, Min Operating Temperature=-55°C, Package Quantity=4000, Supplier Part Number 1=490-7204-1-ND, Tolerance=10%, Voltage=35V, Capacitance=2.2uF, Case/Package=0603, Category="Ceramic Capacitors", ComponentLink1Description=https://datasheet.ciiva.com/14906/partnumbering-e-01-14906490.pdf?src-supplier=Digi-Key, ComponentLink1URL=https://datasheet.ciiva.com/14906/partnumbering-e-01-14906490.pdf?src-supplier=Digi-Key, ComponentLink2Description=https://datasheet.ciiva.com/14906/partnumbering-e-01-14906491.pdf?src-supplier=Digi-Key, ComponentLink2URL=https://datasheet.ciiva.com/14906/partnumbering-e-01-14906491.pdf?src-supplier=Digi-Key, ComponentLink3Description=https://datasheet.ciiva.com/14906/partnumbering-e-01-14906492.pdf?src-supplier=Digi-Key, ComponentLink3URL=https://datasheet.ciiva.com/14906/partnumbering-e-01-14906492.pdf?src-supplier=Digi-Key, Depth=0.8mm, Height=0.8mm, Lead Free="Lead Free", Length=1.6mm, Manufacturer Part Number=GRM188R6YA225KA12D, Material=Ceramic, Mount="Surface Mount", Packaging="Tape and Reel", Pricing 1="1=0.21000, 10=0.14100, 50=0.08480, 100=0.07170, 500=0.04904, 1000=0.04338 (USD)", REACH SVHC="No SVHC", RoHS=Yes, RoHS Compliant=Yes, Series=GRM, Stock 1=81665, Supplier 1=Digi-Key, Termination=SMD/SMT, Thickness=0.035inch, Voltage Rating=35V, Voltage Rating (DC)=35V, Weight=0.000222oz, Width=0.8mm
C16 C17 C19 C20: library part CC0603JRNPO9BN100, "CAP CER 10PF 50V NP0 0603", Case Code (Imperial)=0603, Case Code (Metric)=1608, Dielectric=C0G, Insulation Resistance=100GR, Manufacturer=Yageo, Max Operating Temperature=125°C, Min Operating Temperature=-55°C, Package Quantity=1, Resistor Type=Ceramic, Supplier Part Number 1=311-1058-1-ND, Temperature Coefficient=30ppm/°C, Tolerance=5%, Voltage=50V, Capacitance=10pF, Case/Package=0603, Category="Ceramic Capacitors", ComponentLink1Description=https://datasheet.ciiva.com/5789/1734582-5789616.pdf?src-supplier=Farnell, ComponentLink1URL=https://datasheet.ciiva.com/5789/1734582-5789616.pdf?src-supplier=Farnell, ComponentLink2Description=https://datasheet.ciiva.com/26862/getdatasheetpartid-403524-26862758.pdf?src-supplier=Verical, ComponentLink2URL=https://datasheet.ciiva.com/26862/getdatasheetpartid-403524-26862758.pdf?src-supplier=Verical, ComponentLink3Description=https://datasheet.ciiva.com/11786/0900766b8079c870-11786407.pdf?src-supplier=RSComponents, ComponentLink3URL=https://datasheet.ciiva.com/11786/0900766b8079c870-11786407.pdf?src-supplier=RSComponents, ComponentLink4Description=https://datasheet.ciiva.com/144/mlccorderingcode-144651.pdf?src-supplier=Digi-Key, ComponentLink4URL=https://datasheet.ciiva.com/144/mlccorderingcode-144651.pdf?src-supplier=Digi-Key, ComponentLink5Description=https://datasheet.ciiva.com/46430/1835847-46430150.pdf?src-supplier=Element14, ComponentLink5URL=https://datasheet.ciiva.com/46430/1835847-46430150.pdf?src-supplier=Element14, ComponentLink6Description=https://datasheet.ciiva.com/144/mlccorderingcode-144649.pdf?src-supplier=Digi-Key, ComponentLink6URL=https://datasheet.ciiva.com/144/mlccorderingcode-144649.pdf?src-supplier=Digi-Key, ComponentLink7Description=https://datasheet.ciiva.com/144/mlccorderingcode-144650.pdf?src-supplier=Digi-Key, ComponentLink7URL=https://datasheet.ciiva.com/144/mlccorderingcode-144650.pdf?src-supplier=Digi-Key, ComponentLink8Description=https://datasheet.ciiva.com/8033/1734582-8033706.pdf?src-supplier=Element14, ComponentLink8URL=https://datasheet.ciiva.com/8033/1734582-8033706.pdf?src-supplier=Element14, ComponentLink9Description=https://datasheet.ciiva.com/16625/upy-gp-np0-16v-to-50v-8-16625514.pdf?src-supplier=Avnet+Europe, ComponentLink9URL=https://datasheet.ciiva.com/16625/upy-gp-np0-16v-to-50v-8-16625514.pdf?src-supplier=Avnet+Europe, ComponentLink10Description=https://datasheet.ciiva.com/5425/upy-gp-np0-16v-to-50v-8-5425564.pdf?src-supplier=Mouser, ComponentLink10URL=https://datasheet.ciiva.com/5425/upy-gp-np0-16v-to-50v-8-5425564.pdf?src-supplier=Mouser, ComponentLink11Description=https://datasheet.ciiva.com/7978/1132289-7978126.pdf?src-supplier=Element14, ComponentLink11URL=https://datasheet.ciiva.com/7978/1132289-7978126.pdf?src-supplier=Element14, ComponentLink12Description=https://datasheet.ciiva.com/8033/1734582-8033710.pdf?src-supplier=Element14, ComponentLink12URL=https://datasheet.ciiva.com/8033/1734582-8033710.pdf?src-supplier=Element14, Depth=0.8mm, Height=0.8mm, Lead Free="Lead Free", Length=1.6mm, Manufacturer Part Number=CC0603JRNPO9BN100, Mount="Surface Mount", Number of Pins=2, Packaging="Tape and Reel", Pricing 1="1=0.10000, 10=0.04100, 50=0.02220, 100=0.01810, 500=0.01296, 1000=0.01018 (USD)", Radiation Hardening=No, REACH SVHC="No SVHC", RoHS=Yes, RoHS Compliant=Yes, Series=CC, Stock 1=588987, Supplier 1=Digi-Key, Termination=SMD/SMT, Thickness=0.035inch, Voltage Rating=50V, Voltage Rating (DC)=50V, Width=0.031inch
C26: library part EMK105ABJ225KV-F, "CAP CER 2.2UF 16V X5R 0402", Case Code (Imperial)=0402, Case Code (Metric)=1005, Manufacturer="Taiyo Yuden", Max Operating Temperature=85°C, Min Operating Temperature=-55°C, Supplier Part Number 1=587-6002-1-ND, Tolerance=10%, Voltage Rating=16V, Capacitance=2.2uF, Case/Package=0402, ComponentLink1Description=http://ds.yuden.co.jp/TYCOMPAS/ut/detail.do?productNo=EMK105ABJ225KV-F&amp;fileName=EMK105ABJ225KV-F_SS&amp;mode=specSheetDownload&src-supplier=Digi-Key, ComponentLink1URL=http://ds.yuden.co.jp/TYCOMPAS/ut/detail.do?productNo=EMK105ABJ225KV-F&amp;fileName=EMK105ABJ225KV-F_SS&amp;mode=specSheetDownload&src-supplier=Digi-Key, ComponentLink2Description="https://ds.yuden.co.jp/TYCOMPAS/ut/detail?pn=EMK105ABJ225KV-F &amp;u=M&src-supplier=Digi-Key", ComponentLink2URL="https://ds.yuden.co.jp/TYCOMPAS/ut/detail?pn=EMK105ABJ225KV-F &amp;u=M&src-supplier=Digi-Key", Lead Free="Lead Free", Manufacturer Part Number=EMK105ABJ225KV-F, Mount="Surface Mount", Packaging="Tape and Reel", Pricing 1="1=0.2, 10=0.139, 100=0.0706, 500=0.04834, 1000=0.04276, 2500=0.0409, 5000=0.03718 (USD)", Stock 1=755, Supplier 1=Digi-Key
C27: library part C1608X5R1E106M080AC, "CAP CER 10UF 25V X5R 0603", Case Code (Imperial)=0603, Case Code (Metric)=1608, Dielectric=X5R, Dielectric Material=Ceramic, Manufacturer=TDK, Max Operating Temperature=85°C, Min Operating Temperature=-55°C, Package Quantity=1, Supplier Part Number 1=445-9015-1-ND, Tolerance=20%, Voltage Rating=25V, Capacitance=10uF, Case/Package=0603, Composition=Ceramic, Depth=0.8mm, Height=0.8mm, Lead Free="Lead Free", Length=1.6mm, Manufacturer Part Number=C1608X5R1E106M080AC, Mount="Surface Mount", Packaging="Tape and Reel", Pricing 1="1=0.96, 10=0.704, 100=0.483, 500=0.38238, 1000=0.322 (USD)", REACH SVHC="No SVHC", Stock 1=61681, Supplier 1=Digi-Key, Termination=SMD/SMT, Thickness=0.039inch, Voltage Rating (DC)=25V, Weight=7.1E-05oz, Width=0.8mm
C28: library part CC0603KRX7R9BB221, "CAP CER 220PF 50V X7R 0603", Case Code (Imperial)=0603, Case Code (Metric)=1608, Dielectric=X7R, Dielectric Material=Ceramic, Insulation Resistance=100GR, Manufacturer=Yageo, Max Operating Temperature=125°C, Min Operating Temperature=-55°C, Package Quantity=1, Supplier Part Number 1=2006602, Tolerance=10%, Voltage Rating=50V, Capacitance=220pF, Case/Package=0603, Category="Ceramic Capacitors", ComponentLink1Description=https://datasheet.ciiva.com/7978/1489800-7978170.pdf?src-supplier=Element14, ComponentLink1URL=https://datasheet.ciiva.com/7978/1489800-7978170.pdf?src-supplier=Element14, ComponentLink2Description=https://datasheet.ciiva.com/144/mlccorderingcode-144452.pdf?src-supplier=Digi-Key, ComponentLink2URL=https://datasheet.ciiva.com/144/mlccorderingcode-144452.pdf?src-supplier=Digi-Key, ComponentLink3Description=https://datasheet.ciiva.com/144/mlccorderingcode-144451.pdf?src-supplier=Digi-Key, ComponentLink3URL=https://datasheet.ciiva.com/144/mlccorderingcode-144451.pdf?src-supplier=Digi-Key, ComponentLink4Description=https://datasheet.ciiva.com/144/mlccorderingcode-144453.pdf?src-supplier=Digi-Key, ComponentLink4URL=https://datasheet.ciiva.com/144/mlccorderingcode-144453.pdf?src-supplier=Digi-Key, ComponentLink5Description=https://datasheet.ciiva.com/5425/upy-gphc-x7r-6-3v-to-50v-8-5425432.pdf?src-supplier=Mouser, ComponentLink5URL=https://datasheet.ciiva.com/5425/upy-gphc-x7r-6-3v-to-50v-8-5425432.pdf?src-supplier=Mouser, ComponentLink6Description=https://datasheet.ciiva.com/8033/1489800-8033855.pdf?src-supplier=Element14, ComponentLink6URL=https://datasheet.ciiva.com/8033/1489800-8033855.pdf?src-supplier=Element14, ComponentLink7Description=https://datasheet.ciiva.com/11587/upy-gphc-x7r-6-3v-to-50v-8-11587223.pdf?src-supplier=Avnet, ComponentLink7URL=https://datasheet.ciiva.com/11587/upy-gphc-x7r-6-3v-to-50v-8-11587223.pdf?src-supplier=Avnet, Depth=0.8mm, Halogen Free="Halogen Free", Height=0.8mm, Lead Free="Lead Free", Length=1.6mm, Manufacturer Part Number=CC0603KRX7R9BB221, Mount="Surface Mount", Number of Pins=2, Packaging="Tape and Reel", Pricing 1="4000=0.00700, 12000=0.00700 (GBP)", Radiation Hardening=No, REACH SVHC="No SVHC", Resistor Type=Ceramic, RoHS=Yes, RoHS Compliant=Yes, Series=CC, Stock 1=3500, Supplier 1=RSComponents, Termination=SMD/SMT, Thickness=0.035inch, Voltage Rating (DC)=50V, Width=0.031inch
C29: library part F981E105MMA, "CAP TANT 1UF 20% 25V 0603", Case/Package=0603, ESR (Equivalent Series Resistance)=10R, Manufacturer="Kyocera AVX", Max Operating Temperature=125°C, Min Operating Temperature=-55°C, Supplier Part Number 1=478-8658-1-ND, Tolerance=20%, Voltage Rating=25V, Capacitance=1uF, Category="Tantalum Capacitors", ComponentLink1Description=http://www.mouser.com/ds/2/40/f98-775787.pdf?src-supplier=Mouser, ComponentLink1URL=http://www.mouser.com/ds/2/40/f98-775787.pdf?src-supplier=Mouser, ComponentLink2Description=http://www.farnell.com/datasheets/2096554.pdf?src-supplier=Newark, ComponentLink2URL=http://www.farnell.com/datasheets/2096554.pdf?src-supplier=Newark, ComponentLink3Description=http://datasheets.avx.com/F98.pdf?src-supplier=Digi-Key, ComponentLink3URL=http://datasheets.avx.com/F98.pdf?src-supplier=Digi-Key, Features="General Purpose", Manufacturer Part Number=F981E105MMA, Mount="Surface Mount", Packaging="Tape and Reel", Pricing 1="1=0.79000, 10=0.55800, 50=0.42220, 100=0.36770, 500=0.27236, 1000=0.23151 (USD)", RoHS=Yes, RoHS Compliant=Yes, Stock 1=11167, Supplier 1=Digi-Key
D1: "20V 450mV@500mA 500mA SOD-123 Schottky Barrier Diodes (SBD) ROHS", Manufacturer=Yangzhou, ComponentLink1Description=LCSC, ComponentLink1URL=https://www.lcsc.com/product-detail/Schottky-Barrier-Diodes-SBD_Yangzhou-Yangjie-Elec-Tech-MBR0520_C699111.html, Manufacturer Part Number=MBR0520
J1 J3: "0.5MM PITCH - 80 POS - RIGHT ANG", Manufacturer="Kyocera AVX", ComponentLink1Description=LCSC, ComponentLink1URL=https://lcsc.com/product-detail/FFC-span-style-background-color-ff0-FPC-span-Connectors_Kyocera-046288080000846_C513346.html, Manufacturer Part Number=046288080000846+
J2: "CONN FFC FPC 26POS 0.50MM R/A", Manufacturer=Hirose, Manufacturer Part Number=FH34SRJ-8S-0.5SH(99), Supplier Part Number 1=1362475, Category="FFC / FPC", ComponentLink1Description=https://datasheet.ciiva.com/18561/ed-fh34s-20140305-18561974.pdf?src-supplier=Digi-Key, ComponentLink1URL=https://datasheet.ciiva.com/18561/ed-fh34s-20140305-18561974.pdf?src-supplier=Digi-Key, Pricing 1="5=2.79500, 25=2.28400, 100=2.17100, 250=1.96400 (USD)", RoHS=Yes, Stock 1=190, Supplier 1=RSComponents
L1: "Ferrite Beads 120Ohm 25% 100MHz 1.2A 0.13Ohm DCR 0603 Automotive T/R", Case Code (Imperial)=0603, Case Code (Metric)=1608, DC Resistance (DCR)=130mR, Manufacturer="Taiyo Yuden", Max Current Rating=1.2A, Max DC Current=900mA, Max Operating Temperature=125°C, Min Operating Temperature=-40°C, Package Quantity=4000, Ratings=AEC-Q200, Test Frequency=100MHz, Tolerance=25%, Case/Package=0603, Category="Ferrite Beads and Chips", ComponentLink1Description=http://www.mouser.com/ds/2/396/chipbeads01_e-559265.pdf?src-supplier=Mouser, ComponentLink1URL=http://www.mouser.com/ds/2/396/chipbeads01_e-559265.pdf?src-supplier=Mouser, ComponentLink2Description=http://ds.yuden.co.jp/TYCOMPAS/ut/detail.do?productNo=FBMH1608HL121-TV&fileName=FBMH1608HL121-TV_SS&mode=specSheetDownload&src-supplier=Digi-Key, ComponentLink2URL=http://ds.yuden.co.jp/TYCOMPAS/ut/detail.do?productNo=FBMH1608HL121-TV&fileName=FBMH1608HL121-TV_SS&mode=specSheetDownload&src-supplier=Digi-Key, ComponentLink3Description=https://www.yuden.co.jp/ut/product/category/emisuppression/FBMH1608HL121-TV_SS.pdf?src-supplier=Avnet, ComponentLink3URL=https://www.yuden.co.jp/ut/product/category/emisuppression/FBMH1608HL121-TV_SS.pdf?src-supplier=Avnet, Core Material=Ferrite, Height=0.8mm, Impedance=120R, Length=0.063inch, Manufacturer Part Number=FBMH1608HL121-TV, Mount="Surface Mount", Number of Lines=1, Packaging="Tape and Reel", Pricing 1="4000=0.05939, 8000=0.05429, 16000=0.05185, 24000=0.04942, 32000=0.04698 (USD)", RoHS=Yes, RoHS Compliant=Yes, Supplier 1=Avnet, Supplier Part Number 1=FBMH1608HL121-TV, Termination=SMD/SMT, Weight=7.1E-05oz, Width=0.8mm
L2: library part 74437368033, "FIXED IND 3.3UH 8A 11.8 MOHM SMD", Case/Package=Nonstandard, Current Rating=8A, DC Resistance (DCR)=11.8mR, Frequency=22MHz, Inductance=3.3uH, Inductance Tolerance=20%, Manufacturer="Wurth Electronics", Max Operating Temperature=125°C, Min Operating Temperature=-40°C, Package Quantity=500, Resistor Type=Wirewound, Saturation Current=23A, Series Resistance=11.8MR, Supplier Part Number 1=732-3388-1-ND, Test Frequency=100kHz, Category="Fixed Inductors", ComponentLink1Description=http://www.farnell.com/datasheets/1735871.pdf?src-supplier=Element14, ComponentLink1URL=http://www.farnell.com/datasheets/1735871.pdf?src-supplier=Element14, ComponentLink2Description=http://www.mouser.com/ds/2/445/74437368022-538992.pdf?src-supplier=Mouser, ComponentLink2URL=http://www.mouser.com/ds/2/445/74437368022-538992.pdf?src-supplier=Mouser, ComponentLink3Description=http://katalog.we-online.de/pbs/datasheet/74437368022.pdf?src-supplier=Digi-Key, ComponentLink3URL=http://katalog.we-online.de/pbs/datasheet/74437368022.pdf?src-supplier=Digi-Key, ComponentLink4Description=http://documents.rs-components.com/techlib://itc_doclist_GB.htm?stockno=7568629&src-supplier=RSComponents, ComponentLink4URL=http://documents.rs-components.com/techlib://itc_doclist_GB.htm?stockno=7568629&src-supplier=RSComponents, ComponentLink5Description=http://www.produktinfo.conrad.com/datenblaetter/1000000-1099999/001087607-da-01-ml-WE_LHMI_SMD_SPEICHERDROSSEL_744373_de_en.pdf?src-supplier=Conrad, ComponentLink5URL=http://www.produktinfo.conrad.com/datenblaetter/1000000-1099999/001087607-da-01-ml-WE_LHMI_SMD_SPEICHERDROSSEL_744373_de_en.pdf?src-supplier=Conrad, ComponentLink6Description=https://datasheet.ciiva.com/7354/74437368033-7354466.pdf?src-supplier=Newark, ComponentLink6URL=https://datasheet.ciiva.com/7354/74437368033-7354466.pdf?src-supplier=Newark, ComponentLink7Description=https://datasheet.ciiva.com/7691/1735872-7691596.pdf?src-supplier=Element14, ComponentLink7URL=https://datasheet.ciiva.com/7691/1735872-7691596.pdf?src-supplier=Element14, ComponentLink8Description=https://datasheet.ciiva.com/4961/74437368033-89775-4961151.pdf?src-supplier=Mouser, ComponentLink8URL=https://datasheet.ciiva.com/4961/74437368033-89775-4961151.pdf?src-supplier=Mouser, ComponentLink9Description=https://datasheet.ciiva.com/6693/74437368033-6693468.pdf?src-supplier=Digi-Key, ComponentLink9URL=https://datasheet.ciiva.com/6693/74437368033-6693468.pdf?src-supplier=Digi-Key, ComponentLink10Description=https://datasheet.ciiva.com/6693/74437368033-6693470.pdf?src-supplier=Digi-Key, ComponentLink10URL=https://datasheet.ciiva.com/6693/74437368033-6693470.pdf?src-supplier=Digi-Key, ComponentLink11Description=https://datasheet.ciiva.com/6693/74437368033-6693471.pdf?src-supplier=Digi-Key, ComponentLink11URL=https://datasheet.ciiva.com/6693/74437368033-6693471.pdf?src-supplier=Digi-Key, ComponentLink12Description=https://datasheet.ciiva.com/48690/001087608-da-01-ml-we-lhmi-smd-speicherdrossel-744373-de-en-48690487.pdf?src-supplier=Conrad, ComponentLink12URL=https://datasheet.ciiva.com/48690/001087608-da-01-ml-we-lhmi-smd-speicherdrossel-744373-de-en-48690487.pdf?src-supplier=Conrad, Core Material=Ferrite,Composite, Depth=10mm, Height=3.8mm, Height - Seated (Max)=0.157inch, Length=11mm, Manufacturer Part Number=74437368033, Max DC Current=8A, Mount="Surface Mount", Packaging="Tape and Reel", Pricing 1="1=2.41000, 10=2.35900, 50=2.17700, 100=1.99600, 250=1.90500 (USD)", REACH SVHC=Unknown, RMS Current (Irms)=8A, RoHS=Yes, RoHS Compliant=Yes, Self Resonant Frequency=22MHz, Series=WE-LHMI, Shielding=Shielded, Stock 1=1240, Supplier 1=Digi-Key, Termination=SMD/SMT, Tolerance=20%, Width=10mm
P1 P2 P3 P4: library part "TEST POINT", "Test Point ON"
Q1: "20V 1.6A 500mW 115mΩ@4.5V,1.6A 1.5V@250μA P Channel SOT-23 MOSFETs ROHS", Manufacturer=UMW, Package=SOT-23, Manufacturer Part No=FDN338P
Q2: "SOT-23 MOSFETs ROHS", Manufacturer=UMW, Package=SOT-23, ComponentLink1Description=LCSC, ComponentLink1URL=https://lcsc.com/product-detail/MOSFETs_UMW-Youtai-Semiconductor-Co-Ltd-FDN335N_C347512.html, Manufacturer Part No=FDN335N